# Altium PCB nexnclock_one_in12_6x_rev_2_0.PcbDoc
Units mm, origin at the board's own origin, x right, y up, seen from the top; angles counter-clockwise.
Board outline 147 x 35 mm, 2 copper layers (Top Layer, Bottom Layer), stack 1.571 mm thick; 50 components, 43 nets, 219 pads, 64 vias.
Unrouted connection lines stored in the file: 82.
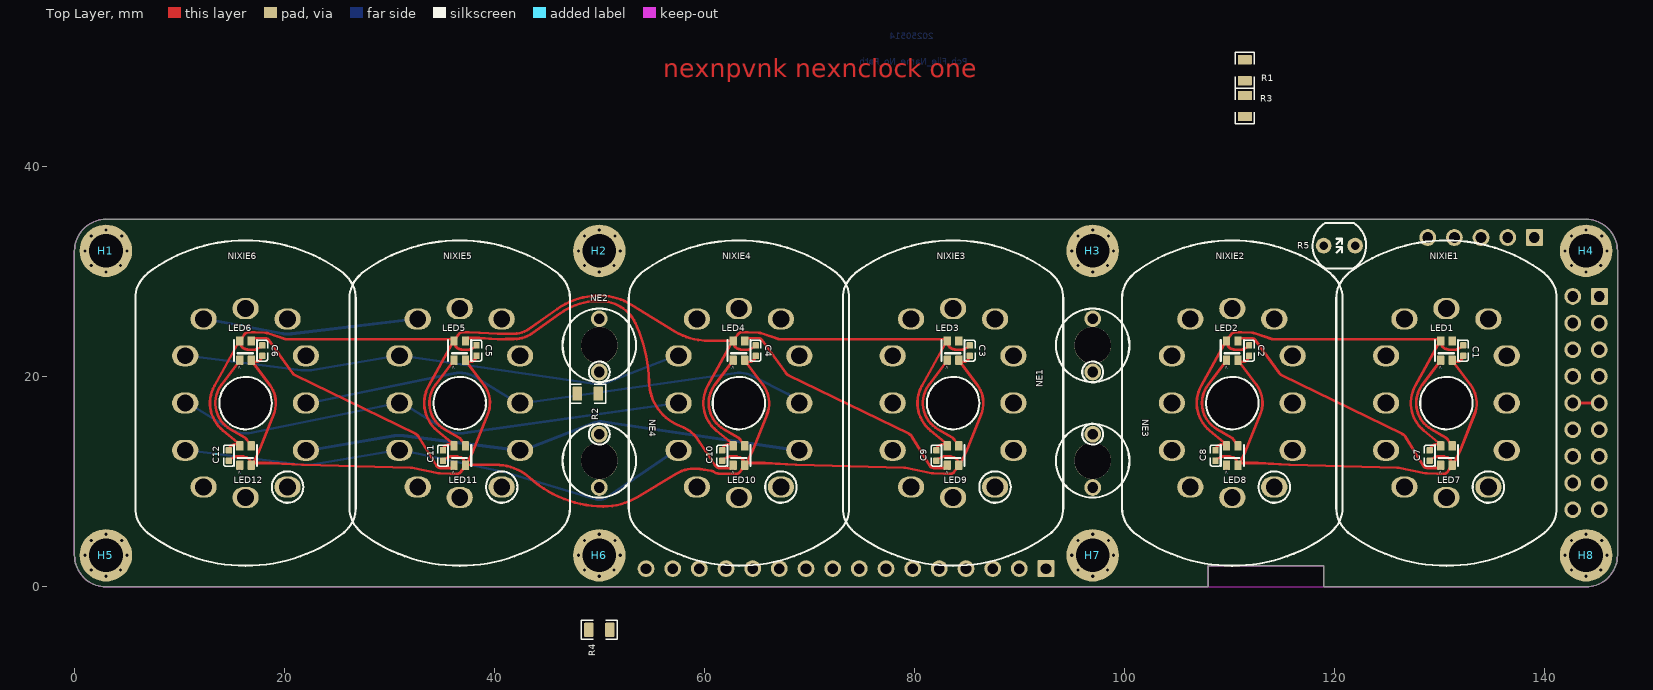
[diagram p0: Top Layer view]
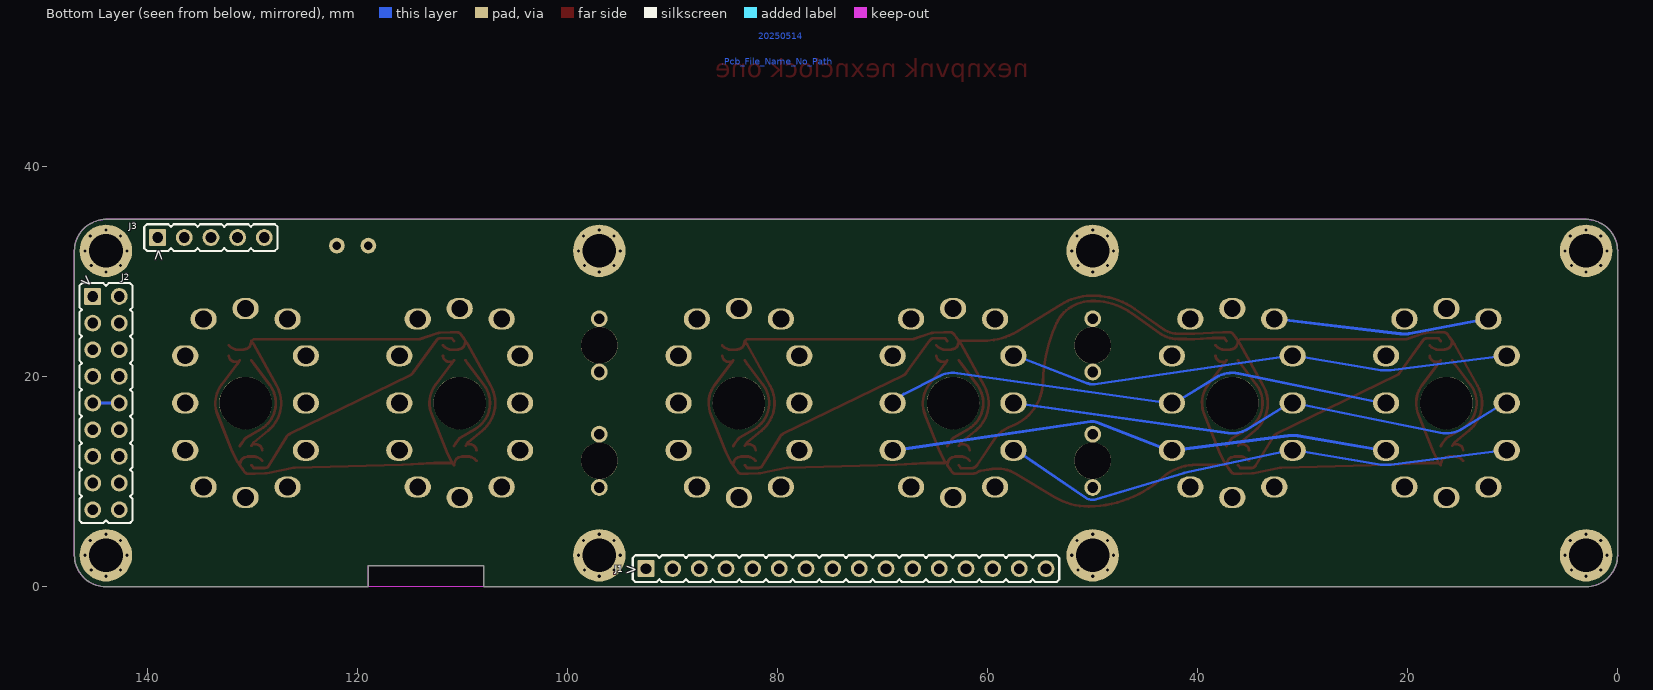
[diagram p1: Bottom Layer view, seen from below]

## Layer stack, top to bottom
Top Solder: solder mask 0.0102, Solder Resist, Dk 3.5
Top Layer: signal copper 0.0356
Dielectric 1: dielectric 1.5, FR-4, Dk 4.8
Bottom Layer: signal copper 0.0356
Bottom Solder: solder mask 0.0102, Solder Resist, Dk 3.5

## Board outline
3,0 cw(c3,3) 0,3 0,32 cw(c3,32) 3,35 144,35 cw(c144,32) 147,32 147,3 cw(c144,3) 144,0 119,0 119,2 108,2 108,0

## Design rules (kind name [scope] priority, off if disabled: settings)
Clearance [All] p1: gap=0.254 ignorepadtopadclearanceinfootprint=TRUE
ComponentClearance ComponentClearance_1 [(Footprint = 'RSH31A')] p1: gap=-5 collisioncheckmode=3 verticalgap=-5 showdistances=FALSE
ComponentClearance [All] p2: gap=0 collisioncheckmode=3 verticalgap=0 showdistances=FALSE
DiffPairsRouting [All] p1: maxlimit=1 minlimit=0.127 mostfreqgap=0.3 toplayer_minwidth=0.127 toplayer_maxwidth=0.381 toplayer_prefwidth=0.3 bottomlayer_minwidth=0.127 bottomlayer_maxwidth=0.381 bottomlayer_prefwidth=0.3 maxuncoupledlength=12.7
Height [All] p1: minheight=0 maxheight=100 prefheight=12.7
HoleSize [All] p1: absolutevalues=TRUE maxlimit=5 minlimit=0.025 maxpercent=80.000 minpercent=20.000
HoleToHoleClearance [All] p1: gap=0.127 allowstackedmicrovias=TRUE
MinimumSolderMaskSliver [All] p1: minsoldermaskwidth=0.05
PolygonConnect PolygonConnect_1 [All] p1: thpad.connectstyle=Relief thpad.reliefconductorwidth=0.254 thpad.reliefentries=4 thpad.polygonreliefangle="90 Angle" thpad.airgapwidth=0.127 smdpad.connectstyle=Relief smdpad.reliefconductorwidth=0.254 smdpad.reliefentries=4 smdpad.polygonreliefangle="90 Angle" smdpad.airgapwidth=0.127 via.connectstyle=Direct via.reliefconductorwidth=0.254 via.reliefentries=4 via.polygonreliefangle="90 Angle" via.airgapwidth=0.254
PolygonConnect PolygonConnect_2 [HasFootprint('R0201')] p2: thpad.connectstyle=Relief thpad.reliefconductorwidth=0.127 thpad.reliefentries=4 thpad.polygonreliefangle="90 Angle" thpad.airgapwidth=0.127 smdpad.connectstyle=Relief smdpad.reliefconductorwidth=0.127 smdpad.reliefentries=4 smdpad.polygonreliefangle="90 Angle" smdpad.airgapwidth=0.127 via.connectstyle=Direct via.reliefconductorwidth=0.254 via.reliefentries=4 via.polygonreliefangle="90 Angle" via.airgapwidth=0.254
RoutingVias [All] p1: holewidth=0.3 width=0.6 viastyle="Through Hole" minholewidth=0.1 minwidth=0.3 maxholewidth=1 maxwidth=1.27
SilkToSilkClearance [All] p1: silktosilkclearance=0
SilkToSolderMaskClearance [IsPad] p1: minsilkscreentomaskgap=0.127 clearancetoexposedcopper=TRUE
SolderMaskExpansion [All] p1: expansion=0.05 istentingtop=FALSE
SupplyNets "Schematic Supply Nets_2" [InNet('HVGND')] p1: voltage=0.000
SupplyNets "Schematic Supply Nets_1" [InNet('VCC_5V0')] p2: voltage=0.000
SupplyNets "Schematic Supply Nets" [InNet('GND')] p3: voltage=0.000
Width [All] p1: maxlimit=6 minlimit=0.2 preferedwidth=0.254
22 further rules are at their usual default settings.

## Components (designator, comment, footprint, x,y, rotation, side; value= is the part's Value field where it differs from the comment)
C1 "CAP" C0402 132.3,22.5 r270 top value=100nF
C2 "CAP" C0402 111.9,22.5 r270 top value=100nF
C3 "CAP" C0402 85.3,22.5 r270 top value=100nF
C4 "CAP" C0402 64.9,22.5 r270 top value=100nF
C5 "CAP" C0402 38.3,22.5 r270 top value=100nF
C6 "CAP" C0402 17.9,22.5 r270 top value=100nF
C7 "CAP" C0402 129.1,12.5 r270 top value=100nF
C8 "CAP" C0402 108.7,12.5 r270 top value=100nF
C9 "CAP" C0402 82.1,12.5 r270 top value=100nF
C10 "CAP" C0402 61.7,12.5 r270 top value=100nF
C11 "CAP" C0402 35.1,12.5 r270 top value=100nF
C12 "CAP" C0402 14.7,12.5 r270 top value=100nF
H1 "MOUNT_HOLE" MOUNT_HOLE_D_3_2_MM 3,32 r0 top locked
H2 "MOUNT_HOLE" MOUNT_HOLE_D_3_2_MM 50,32 r0 top locked
H3 "MOUNT_HOLE" MOUNT_HOLE_D_3_2_MM 97,32 r0 top locked
H4 "MOUNT_HOLE" MOUNT_HOLE_D_3_2_MM 144,32 r0 top locked
H5 "MOUNT_HOLE" MOUNT_HOLE_D_3_2_MM 3,3 r0 top locked
H6 "MOUNT_HOLE" MOUNT_HOLE_D_3_2_MM 50,3 r0 top locked
H7 "MOUNT_HOLE" MOUNT_HOLE_D_3_2_MM 97,3 r0 top locked
H8 "MOUNT_HOLE" MOUNT_HOLE_D_3_2_MM 144,3 r0 top locked
J1 "P_HEADER_1X16" P_HEADER_STRAIGHT_2_54_1X16 73.5,1.73 r180 bottom
J2 "P_HEADER_2X9" P_HEADER_STRAIGHT_2_54_2X9 144,17.5 r270 bottom
J3 "P_HEADER_1X5" P_HEADER_STRAIGHT_2_54_1X5 134,33.27 r180 bottom
LED1 "WS2812B-2020" LED-SMD_4P-L2.0-W2.0-TL_WS2812B-2020 130.7,22.5 r90 top
LED2 "WS2812B-2020" LED-SMD_4P-L2.0-W2.0-TL_WS2812B-2020 110.3,22.5 r90 top
LED3 "WS2812B-2020" LED-SMD_4P-L2.0-W2.0-TL_WS2812B-2020 83.7,22.5 r90 top
LED4 "WS2812B-2020" LED-SMD_4P-L2.0-W2.0-TL_WS2812B-2020 63.3,22.5 r90 top
LED5 "WS2812B-2020" LED-SMD_4P-L2.0-W2.0-TL_WS2812B-2020 36.7,22.5 r90 top
LED6 "WS2812B-2020" LED-SMD_4P-L2.0-W2.0-TL_WS2812B-2020 16.3,22.5 r90 top
LED7 "WS2812B-2020" LED-SMD_4P-L2.0-W2.0-TL_WS2812B-2020 130.7,12.5 r90 top
LED8 "WS2812B-2020" LED-SMD_4P-L2.0-W2.0-TL_WS2812B-2020 110.3,12.5 r90 top
LED9 "WS2812B-2020" LED-SMD_4P-L2.0-W2.0-TL_WS2812B-2020 83.7,12.5 r90 top
LED10 "WS2812B-2020" LED-SMD_4P-L2.0-W2.0-TL_WS2812B-2020 63.3,12.5 r90 top
LED11 "WS2812B-2020" LED-SMD_4P-L2.0-W2.0-TL_WS2812B-2020 36.7,12.5 r90 top
LED12 "WS2812B-2020" LED-SMD_4P-L2.0-W2.0-TL_WS2812B-2020 16.3,12.5 r90 top
NE1 "NEON_LAMP" NEON_LAMP_WITH_HOLE_NEW 97,23 r90 top
NE2 "NEON_LAMP" NEON_LAMP_WITH_HOLE_NEW 50,23 r90 top
NE3 "NEON_LAMP" NEON_LAMP_WITH_HOLE_NEW 97,12 r270 top
NE4 "NEON_LAMP" NEON_LAMP_WITH_HOLE_NEW 50,12 r270 top
NIXIE1 "IN-12" RSH31A 130.7,17.5 r0 top locked
NIXIE2 "IN-12" RSH31A 110.3,17.5 r0 top locked
NIXIE3 "IN-12" RSH31A 83.7,17.5 r0 top locked
NIXIE4 "IN-12" RSH31A 63.3,17.5 r0 top locked
NIXIE5 "IN-12" RSH31A 36.7,17.5 r0 top locked
NIXIE6 "IN-12" RSH31A 16.3,17.5 r0 top locked
R1 "RESISTOR" R0805 111.5,49.2 r90 top value=10k
R2 "RESISTOR" R0805 48.9,18.4 r180 top value=10k
R3 "RESISTOR" R0805 111.5,45.8 r270 top value=10k
R4 "RESISTOR" R0805 50,-4.1 r0 top value=10k
R5 "PHOTORESISTOR" GL55XX_2 120.5,32.5 r180 top value=10k

## Footprints (in the part's own frame and the unit in brackets; to place one, negate y for a bottom-side part, rotate by r counter-clockwise, add the part's x,y. Pads: shape width x height; smd on the part's side, far side on the other; paste and mask are expansions set on the pad)
C0402 [mm]
  rrect20% 0.6x0.6 smd mask+0.05: 1(-0.5,0) 2(0.5,0)
  silkscreen extent -1,-0.5 1,0.5, body extent -0.5,-0.25 0.5,0.25, height 0.52
GL55XX_2 [mm] "Photoresistor 3mm pitch"
  round 1.5 hole 0.8 mask+0.05: 1(-1.5,0) 2(1.5,0)
  silkscreen extent -2.55,-2.15 2.55,2.2
LED-SMD_4P-L2.0-W2.0-TL_WS2812B-2020 [mm]
  rrect20% 0.9x0.7 smd mask+0.05: 1(-0.915,0.55) 2(-0.915,-0.55) 3(0.915,-0.55) 4(0.915,0.55)
  silkscreen extent -1,-1.1 1,1.1, body extent -1.1,-1 1.1,1, height 0.84
MOUNT_HOLE_D_3_2_MM [mm]
  round 5 hole 3.2 mask+0.05: 1(0,0)
NEON_LAMP_WITH_HOLE_NEW [mm] "INS-1, IN-3"
  round 1.6 hole 1.02 unplated mask+0.05: 1(-2.54,0) 2(2.54,0)
  round 3.5 hole 3.5 unplated mask+0.05: HOLE(0,0)
  silkscreen extent -3.54,-3.5 3.5,3.5, body extent -3.5,-3.25 3.5,3.25, height 25
P_HEADER_STRAIGHT_2_54_1X5 [mm]
  rrect10% 1.6x1.6 hole 1.02 paste-2539.97 mask+0.05: 1(-5.08,0)
  round 1.6 hole 1.02 paste-2539.97 mask+0.05: 2(-2.54,0) 3(0,0)
  round 1.6 hole 1.02 mask+0.05: 4(2.54,0) 5(5.08,0)
  silkscreen extent -6.35,-1.27 6.35,1.27, body extent -6.35,-1.25 6.35,1.25, height 8.55
P_HEADER_STRAIGHT_2_54_1X16 [mm]
  rrect10% 1.6x1.6 hole 1.02 paste-2539.97 mask+0.05: 1(-19.05,0)
  round 1.6 hole 1.02 paste-2539.97 mask+0.05: 2(-16.51,0) 3(-13.97,0)
  round 1.6 hole 1.02 mask+0.05: 4(-11.43,0) 5(-8.89,0) 6(-6.35,0) 7(-3.81,0) 8(-1.27,0) 9(1.27,0) 10(3.81,0) 11(6.35,0) 12(8.89,0) 13(11.43,0) 14(13.97,0) 15(16.51,0) 16(19.05,0)
  silkscreen extent -20.32,-1.27 20.32,1.27, body extent -20.32,-1.25 20.32,1.25, height 8.55
P_HEADER_STRAIGHT_2_54_2X9 [mm]
  rrect10% 1.6x1.6 hole 1.02 paste-2539.97 mask+0.05: 1(-10.16,-1.27)
  round 1.6 hole 1.02 paste-2539.97 mask+0.05: 2(-10.16,1.27) 3(-7.62,-1.27)
  round 1.6 hole 1.02 mask+0.05: 4(-7.62,1.27) 5(-5.08,-1.27) 6(-5.08,1.27) 7(-2.54,-1.27) 8(-2.54,1.27) 9(0,-1.27) 10(0,1.27) 11(2.54,-1.27) 12(2.54,1.27) 13(5.08,-1.27) 14(5.08,1.27) 15(7.62,-1.27) 16(7.62,1.27) 17(10.16,-1.27) 18(10.16,1.27)
  silkscreen extent -11.43,-2.54 11.43,2.54, body extent -11.43,-2.52 11.43,2.48, height 8.55
R0805 [mm]
  rrect20% 0.9x1.35 smd mask+0.05: 1(-1,0) 2(1,0)
  silkscreen extent -1.7,-0.9 1.7,0.9, body extent -1,-0.63 1,0.63, height 0.53
RSH31A [mm] "IN-12A, IN-12B, IN-15A, IN-15B"
  oval 2.5x2 hole 1.6 paste-2539.97 mask+0.05: 1(4,-8) 2(5.75,-4.5) 3(5.75,0) 4(5.75,4.5) 5(4,8) 6(0,9) 7(-4,8) 8(-5.75,4.5) 9(-5.75,0) 10(-5.75,-4.5) 11(-4,-8) 12(0,-9)
  silkscreen extent -10.5,-15.5 10.5,15.5, body extent -10.5,-15.48 10.5,15.48, height 29

## Part data
C1 C2 C3 C4 C5 C6 C7 C8 C9 C10 C11 C12: Dielectric=X5R, Manufacturer=_manufacturer, Voltage=10V, Part Reference=_part, PCB Footprint=C0402
H1 H2 H3 H4 H5 H6 H7 H8 J1 J2 J3 LED1 LED2 LED3 LED4 LED5 LED6 LED7 LED8 LED9 LED10 LED11 LED12 R5: Manufacturer=_manufacturer
  H1 H2 H3 H4 H5 H6 H7 H8: PCB Footprint=MOUNT_HOLE_D_3_2_MM, Procurement Type=DNP
  J1: Part Reference=_part, PCB Footprint=P_HEADER_STRAIGHT_2_54_1X16
  J2: Part Reference=_part, PCB Footprint=P_HEADER_STRAIGHT_2_54_2X9
  J3: Part Reference=_part, PCB Footprint=P_HEADER_STRAIGHT_2_54_1X5
  LED1 LED2 LED3 LED4 LED5 LED6 LED7 LED8 LED9 LED10 LED11 LED12: Part Reference=_part, PCB Footprint=LED-SMD_4P-L2.0-W2.0-TL_WS2812B-2020
  R5: Part Reference=_part, PCB Footprint=GL55XX_2
NE1 NE2 NE3 NE4: "INS-1, IN-3", Manufacturer=USSR, Part Reference=_part, PCB Footprint=NEON_LAMP_WITH_HOLE_NEW, Procurement Type=DNP
NIXIE1 NIXIE2 NIXIE3 NIXIE4 NIXIE5 NIXIE6: Manufacturer=USSR, Part Reference=_part, PCB Footprint=RSH31A, Procurement Type=DNP
R1 R2 R3 R4: Manufacturer=_manufacturer, Tolerancy=5%, Part Reference=_part, PCB Footprint=R0805

## Free pads (board coordinates)
  round 5 hole 5 mask+0.05: HOLE(16.3,17.5) HOLE(36.7,17.5) HOLE(63.3,17.5) HOLE(83.7,17.5) HOLE(110.3,17.5) HOLE(130.7,17.5)

## Via types
v1: diameter 0.6, hole 0.3, Top Layer to Bottom Layer, tented bottom, 64 vias

## Nets (pads, with @x,y where several pads share a name; then routed paths per layer and width w, separated by ;. In a path a pad name is that pad's centre, name@x,y a point inside that pad or via, vN(x,y) a via of type N, cw(c..) or ccw(c..) an arc to the next point about the centre after c; other vN are vias at no path point)
A0: J1.2 NIXIE1.1
A1: J1.4 NIXIE2.1
A2: J1.6 R1.1 R2.1 R3.1 R4.1
A3: J1.8 NIXIE3.1
A4: J1.10 NIXIE4.1
A5: J1.12 NIXIE5.1
A6: J1.14 NIXIE6.1
AL_DATA: J3.2 LED1.3
C0: J2.1 NIXIE1.6 NIXIE2.6 NIXIE3.6 NIXIE4.6 NIXIE5.6 NIXIE6.6
C1: J2.2 NIXIE1.7 NIXIE2.7 NIXIE3.7 NIXIE4.7 NIXIE5.7 NIXIE6.7 | length 20.6
  Bottom Layer w0.3: NIXIE6.7 12.55,25.5 19.787,24.121 ccw(c20.05,25.5) 20.05,24.096 20.55,24.096 ccw(c20.55,25.5) 20.716,24.106 32.45,25.5 NIXIE5.7
C2: J2.3 NIXIE1.5 NIXIE2.5 NIXIE3.5 NIXIE4.5 NIXIE5.5 NIXIE6.5
C3: J2.4 NE1.2
C4: J2.5 NIXIE1.4 NIXIE2.4 NIXIE3.4 NIXIE4.4 NIXIE5.4 NIXIE6.4
C5: J2.6 NIXIE1.8 NIXIE2.8 NIXIE3.8 NIXIE4.8 NIXIE5.8 NIXIE6.8 | length 47.9
  Bottom Layer w0.254: NIXIE6.8 10.8,22 21.627,20.63 ccw(c21.8,22) 21.8,20.619 22.3,20.619 ccw(c22.3,22) 22.527,20.638 30.7,22 NIXIE5.8 31.2,22 49.83,19.291 ccw(c50,20.46) 50.424,19.358 57.3,22 NIXIE4.8
C6: J2.7 NIXIE1.9 NIXIE2.9 NIXIE3.9 NIXIE4.9 NIXIE5.9 NIXIE6.9 | length 49
  Bottom Layer w0.254: NIXIE6.9 10.8,17.5 14.791,15.046 ccw(c16.3,17.5) 16.876,14.677 30.7,17.5 NIXIE5.9 31.2,17.5 35.191,15.046 ccw(c36.7,17.5) 37.103,14.647 57.3,17.5 NIXIE4.9
C7: J2.8 NE2.2
C8: J2.11
C9: J2.12 NIXIE1.3 NIXIE2.3 NIXIE3.3 NIXIE4.3 NIXIE5.3 NIXIE6.3 | length 49.1
  Bottom Layer w0.254: NIXIE6.3 22.3,17.5 36.124,20.323 cw(c36.7,17.5) 38.209,19.954 42.2,17.5 NIXIE5.3 42.7,17.5 62.891,20.352 62.899,20.353 cw(c63.3,17.5) 64.6,20.071 ; 64.601,20.071 64.607,20.068 67.987,18.357 67.989,18.356 cw(c67.7,17.79) 68.178,18.209 68.8,17.5 NIXIE4.3
C10: J2.13 NE4.2
C11: J2.14 NIXIE1.10 NIXIE2.10 NIXIE3.10 NIXIE4.10 NIXIE5.10 NIXIE6.10 | length 49.2
  Bottom Layer w0.254: NIXIE6.10 10.8,13 21.627,11.63 ccw(c21.8,13) 21.8,11.619 22.3,11.619 ccw(c22.3,13) 22.527,11.638 30.7,13 NIXIE5.10 31.2,13 41.232,10.852 41.24,10.85 cw(c40.95,9.5) 41.345,10.823 41.353,10.821 49.657,8.33 49.661,8.329 ccw(c50,9.46) 50.664,8.484 50.668,8.486 57.3,13 NIXIE4.10
C12: J2.15 NIXIE1.2 NIXIE2.2 NIXIE3.2 NIXIE4.2 NIXIE5.2 NIXIE6.2 | length 47.9
  Bottom Layer w0.3: NIXIE6.2 22.3,13 30.465,14.384 cw(c30.7,13) 30.697,14.404 31.2,14.404 cw(c31.2,13) 31.379,14.393 42.2,13 NIXIE5.2 42.7,13 49.559,15.66 49.567,15.663 cw(c50,14.54) 50.173,15.732 50.18,15.73 68.8,13 NIXIE4.2
C13: J2.16 NE3.2
C14: J2.17 NIXIE1.11 NIXIE2.11 NIXIE3.11 NIXIE4.11 NIXIE5.11 NIXIE6.11
C15: J2.18 NIXIE1.12 NIXIE2.12 NIXIE3.12 NIXIE4.12 NIXIE5.12 NIXIE6.12
GND: C1.2 C2.2 C3.2 C4.2 C5.2 C6.2 C7.2 C8.2 C9.2 C10.2 C11.2 C12.2 J3.1 J3.4 LED1.2 LED2.2 LED3.2 LED4.2 LED5.2 LED6.2 LED7.2 LED8.2 LED9.2 LED10.2 LED11.2 LED12.2 R5.2 | length 180.7
  Top Layer w0.254: C12.2 14.873,12.173 15.27,12.369 cw(c15.47,11.965) 15.468,12.416 16.03,12.416 cw(c16.03,11.965) 16.148,12.4 16.331,12.35 16.333,12.35 cw(c16.165,11.738) 16.776,11.908 LED12.2 17.073,11.798 18.719,11.798 cw(c18.718,11.163) 18.754,11.797 ; LED6.2 16.995,21.375 17.073,21.262 18.601,19.233 cw(c16.3,17.5) 18.975,16.429 17.549,12.867 cw(c17.13,13.035) 17.534,12.834 LED12.2@17.073,11.908 ; LED6.2@17.073,21.428 17.268,21.428 ccw(c17.268,22.063) 17.857,21.827 C6.2 ; 18.756,11.797 21.718,11.621 ccw(c21.8,13) 21.764,11.619 32.042,11.352 cw(c32.026,10.717) 32.151,11.34 34.672,10.83 ccw(c34.86,11.76) 34.807,10.812 35.845,10.755 ccw(c35.87,11.205) 35.87,10.754 36.43,10.754 ccw(c36.43,11.205) 36.796,10.941 37.027,11.262 LED11.2 ; C11.2 35.273,12.173 35.67,12.369 cw(c35.87,11.965) 35.868,12.416 36.43,12.416 cw(c36.43,11.965) 36.548,12.4 36.731,12.35 36.733,12.35 cw(c36.565,11.738) 37.176,11.908 LED11.2 ; LED5.2 37.395,21.375 37.473,21.262 39.001,19.233 cw(c36.7,17.5) 39.375,16.429 37.949,12.867 cw(c37.53,13.035) 37.934,12.834 37.473,11.908 LED11.2 ; LED5.2@37.473,21.428 37.668,21.428 ccw(c37.668,22.063) 38.257,21.827 C5.2 ; C10.2 61.873,12.173 62.27,12.369 cw(c62.47,11.965) 62.468,12.416 63.03,12.416 cw(c63.03,11.965) 63.148,12.4 63.331,12.35 63.333,12.35 cw(c63.165,11.738) 63.776,11.908 LED10.2 63.627,11.262 63.396,10.941 cw(c63.03,11.205) 63.03,10.754 62.47,10.754 cw(c62.47,11.205) 62.46,10.754 61.441,10.775 cw(c61.46,11.76) 60.907,10.945 ccw(c60.552,10.418) 60.652,11.045 59.597,11.215 ccw(c59.065,7.911) 57.341,10.78 53.598,8.534 cw(c50.404,13.854) 50.376,7.649 cw(c50.451,18.173) 50.374,7.649 cw(c50.451,18.173) 43.393,10.366 cw(c50.451,18.173) 43.391,10.368 ccw(c40.152,6.801) 40.131,11.619 cw(c40.13,12.254) 40.13,11.619 37.473,11.619 LED11.2 ; LED4.2 63.995,21.375 64.073,21.262 65.601,19.233 cw(c63.3,17.5) 65.975,16.429 64.549,12.867 cw(c64.13,13.035) 64.534,12.834 LED10.2@64.073,11.908 ; LED10.2@64.073,11.798 65.719,11.798 cw(c65.718,11.163) 65.754,11.797 ; LED4.2@64.073,21.428 64.268,21.428 ccw(c64.268,22.063) 64.857,21.827 C4.2 ; 65.756,11.797 68.718,11.621 ccw(c68.8,13) 68.764,11.619 79.042,11.352 cw(c79.026,10.717) 79.151,11.34 81.672,10.83 ccw(c81.86,11.76) 81.807,10.812 82.845,10.755 ccw(c82.87,11.205) 82.87,10.754 83.43,10.754 ccw(c83.43,11.205) 83.796,10.941 84.027,11.262 LED9.2 ; C9.2 82.273,12.173 82.67,12.369 cw(c82.87,11.965) 82.868,12.416 83.43,12.416 cw(c83.43,11.965) 83.548,12.4 83.731,12.35 83.733,12.35 cw(c83.565,11.738) 84.176,11.908 LED9.2 ; LED3.2 84.395,21.375 84.473,21.262 86.001,19.233 cw(c83.7,17.5) 86.375,16.429 84.949,12.867 cw(c84.53,13.035) 84.934,12.834 84.473,11.908 LED9.2 ; LED3.2@84.473,21.428 84.668,21.428 ccw(c84.668,22.063) 85.257,21.827 C3.2 ; C8.2 108.873,12.173 109.27,12.369 cw(c109.47,11.965) 109.468,12.416 110.03,12.416 cw(c110.03,11.965) 110.148,12.4 110.331,12.35 110.333,12.35 cw(c110.165,11.738) 110.776,11.908 LED8.2 111.073,11.798 112.719,11.798 cw(c112.718,11.163) 112.754,11.797 ; LED2.2 110.995,21.375 111.073,21.262 112.601,19.233 cw(c110.3,17.5) 112.975,16.429 111.549,12.867 cw(c111.13,13.035) 111.534,12.834 LED8.2@111.073,11.908 ; LED2.2@111.073,21.428 111.268,21.428 ccw(c111.268,22.063) 111.857,21.827 C2.2 ; 112.756,11.797 115.718,11.621 ccw(c115.8,13) 115.764,11.619 126.042,11.352 cw(c126.026,10.717) 126.151,11.34 ; 126.152,11.34 128.672,10.83 ccw(c128.86,11.76) 128.807,10.812 129.845,10.755 ccw(c129.87,11.205) 129.87,10.754 130.43,10.754 ccw(c130.43,11.205) 130.796,10.941 131.027,11.262 LED7.2 ; C7.2 129.273,12.173 129.67,12.369 cw(c129.87,11.965) 129.868,12.416 130.43,12.416 cw(c130.43,11.965) 130.548,12.4 130.731,12.35 130.733,12.35 cw(c130.565,11.738) 131.176,11.908 LED7.2 ; LED1.2 131.395,21.375 131.473,21.262 133.001,19.233 cw(c130.7,17.5) 133.375,16.429 ; LED1.2@131.473,21.428 131.668,21.428 ccw(c131.668,22.063) 132.257,21.827 C1.2 ; 133.375,16.429 131.949,12.867 cw(c131.53,13.035) 131.934,12.834 131.473,11.908 LED7.2
HVGND: J2.9 J2.10 | length 5.1
  Top Layer w0.254: J2.10 J2.9
  Bottom Layer w0.254: J2.10 J2.9
NetJ3_5: J3.5 R5.1
NetLED1_1: LED1.1 LED7.3 | length 10.4
  Top Layer w0.254: LED1.1 129.927,21.262 128.399,19.233 ccw(c130.7,17.5) 129.242,15.015 130.658,14.184 cw(c130.43,13.795) 130.796,14.059 131.027,13.738 LED7.3
NetLED2_1: LED2.1 LED8.3 | length 10.4
  Top Layer w0.254: LED2.1 109.527,21.262 107.999,19.233 ccw(c110.3,17.5) 108.842,15.015 110.258,14.184 cw(c110.03,13.795) 110.396,14.059 110.627,13.738 LED8.3
NetLED2_3: LED2.3 LED7.1 | length 24.3
  Top Layer w0.254: LED2.3 111.073,23.681 111.66,23.681 112.14,23.681 cw(c112.14,23.24) 112.497,23.499 114.782,20.353 ccw(c115.296,20.726) 115.017,20.156 126.508,14.558 126.509,14.557 cw(c126.23,13.987) 126.771,14.319 128.484,11.529 ccw(c128.86,11.76) 128.86,11.319 129.34,11.319 129.927,11.319 LED7.1
NetLED3_1: LED3.1 LED9.3 | length 10.4
  Top Layer w0.254: LED3.1 82.927,21.262 81.399,19.233 ccw(c83.7,17.5) 82.242,15.015 83.658,14.184 cw(c83.43,13.795) 83.796,14.059 84.027,13.738 LED9.3
NetLED3_3: LED3.3 LED8.1
NetLED4_1: LED4.1 LED10.3 | length 10.4
  Top Layer w0.254: LED4.1 62.527,21.262 60.999,19.233 ccw(c63.3,17.5) 61.842,15.015 63.258,14.184 cw(c63.03,13.795) 63.396,14.059 63.627,13.738 LED10.3
NetLED4_3: LED4.3 LED9.1 | length 24.3
  Top Layer w0.254: LED4.3 64.073,23.681 64.66,23.681 65.14,23.681 cw(c65.14,23.24) 65.497,23.499 67.782,20.353 ccw(c68.296,20.726) 68.017,20.156 79.508,14.558 79.509,14.557 cw(c79.23,13.987) 79.771,14.319 81.484,11.529 ccw(c81.86,11.76) 81.86,11.319 82.34,11.319 82.927,11.319 LED9.1
NetLED5_1: LED5.1 LED11.3 | length 10.4
  Top Layer w0.254: LED5.1 35.927,21.262 34.399,19.233 ccw(c36.7,17.5) 35.242,15.015 36.658,14.184 cw(c36.43,13.795) 36.796,14.059 37.027,13.738 LED11.3
NetLED5_3: LED5.3 LED10.1 | length 36.4
  Top Layer w0.254: LED5.3 37.455,23.699 38.059,23.699 ; 38.06,23.699 38.54,23.699 cw(c38.54,23.24) 38.569,23.698 40.34,23.596 ccw(c40.371,24.121) 40.344,23.596 ccw(c40.45,25.5) 40.45,23.593 40.95,23.593 ccw(c40.95,25.5) 41.062,23.596 41.08,23.597 cw(c41.123,22.874) 41.119,23.599 41.121,23.599 41.401,23.599 41.865,23.599 ; 41.865,23.599 ccw(c41.865,24.107) 41.868,23.599 ccw(c41.858,26.644) 43.62,24.162 46.283,26.05 cw(c49.977,20.84) 50.158,27.225 50.163,27.225 cw(c50.059,23.424) 52.048,26.665 ; 52.049,26.664 52.054,26.661 52.238,26.548 cw(c51.906,26.007) 52.277,26.522 ; 52.278,26.521 cw(c50.107,23.527) 53.563,24.845 53.563,24.843 ccw(c54.156,25.071) 53.572,24.822 cw(c40.492,19.191) 54.728,19.55 ccw(c59.4,19.663) 54.728,19.549 ccw(c59.4,19.663) 57.537,15.377 58.074,15.144 cw(c56.904,12.455) 59.205,14.273 cw(c58.706,13.88) 59.232,14.236 61.028,11.58 ccw(c61.554,11.936) 61.134,11.459 61.169,11.429 ccw(c61.46,11.76) 61.348,11.333 61.393,11.322 ccw(c61.554,11.936) 61.553,11.301 62.527,11.301 62.545,11.301 LED10.1
NetLED6_1: LED6.1 LED12.3 | length 10.4
  Top Layer w0.254: LED6.1 15.527,21.262 13.999,19.233 ccw(c16.3,17.5) 14.842,15.015 16.258,14.184 cw(c16.03,13.795) 16.396,14.059 16.627,13.738 LED12.3
NetLED6_3: LED6.3 LED11.1 | length 24.3
  Top Layer w0.254: LED6.3 17.073,23.681 17.66,23.681 18.14,23.681 cw(c18.14,23.24) 18.497,23.499 20.782,20.353 ccw(c21.296,20.726) 21.017,20.156 32.508,14.558 32.509,14.557 cw(c32.23,13.987) 32.771,14.319 34.484,11.529 ccw(c34.86,11.76) 34.86,11.319 35.34,11.319 35.927,11.319 LED11.1
NetNE1_1: NE1.1 R1.2
NetNE2_1: NE2.1 R2.2
NetNE3_1: NE3.1 R3.2
NetNE4_1: NE4.1 R4.2
VCC_5V0: C1.1 C2.1 C3.1 C4.1 C5.1 C6.1 C7.1 C8.1 C9.1 C10.1 C11.1 C12.1 J3.3 LED1.4 LED2.4 LED3.4 LED4.4 LED5.4 LED6.4 LED7.4 LED8.4 LED9.4 LED10.4 LED11.4 LED12.4 | length 185.8
  Top Layer w0.254: C12.1 14.743,13.173 cw(c15.332,12.937) 15.332,13.572 LED12.4@15.527,13.572 ; LED12.4@15.737,13.425 15.604,13.624 15.527,13.738 14.136,14.892 cw(c16.3,17.5) 13.337,19.144 15.527,23.092 LED6.4 ; C6.1 17.727,22.827 17.33,22.631 cw(c17.13,23.035) 17.132,22.584 16.57,22.584 cw(c16.57,23.035) 16.452,22.6 16.269,22.65 16.267,22.65 cw(c16.435,23.262) 15.824,23.092 LED6.4 ; C11.1 35.143,13.173 cw(c35.732,12.937) 35.732,13.572 LED11.4@35.927,13.572 ; LED11.4@36.137,13.425 36.004,13.624 35.927,13.738 34.536,14.892 cw(c36.7,17.5) 33.737,19.144 35.927,23.092 LED5.4 ; C5.1 38.127,22.827 37.73,22.631 cw(c37.53,23.035) 37.532,22.584 36.97,22.584 cw(c36.97,23.035) 36.852,22.6 36.669,22.65 36.667,22.65 cw(c36.835,23.262) 36.224,23.092 LED5.4 ; 45.989,26.465 43.325,24.575 cw(c41.858,26.644) 41.865,24.107 41.863,24.107 41.121,24.107 ccw(c41.121,23.599) 41.119,24.107 41.117,24.107 40.344,24.106 cw(c40.345,24.741) 40.309,24.107 38.598,24.205 ccw(c38.54,23.24) 38.575,24.206 37.55,24.246 cw(c37.574,24.88) 37.547,24.246 ccw(c37.53,23.795) 37.53,24.246 36.97,24.246 ccw(c36.97,23.795) 36.604,24.059 36.373,23.738 LED5.4 ; 45.989,26.465 cw(c49.977,20.84) 50.173,27.733 cw(c50.02,21.937) 53.054,26.877 57.247,24.302 ccw(c60.222,29.139) 59.424,23.516 60.035,23.431 ccw(c60.122,24.06) 60.122,23.425 62.527,23.425 LED4.4 ; C10.1 61.743,13.173 cw(c62.332,12.937) 62.332,13.572 LED10.4@62.527,13.572 ; LED10.4@62.737,13.425 62.604,13.624 62.527,13.738 61.136,14.892 cw(c63.3,17.5) 60.337,19.144 62.527,23.092 LED4.4 ; C4.1 64.727,22.827 64.33,22.631 cw(c64.13,23.035) 64.132,22.584 63.57,22.584 cw(c63.57,23.035) 63.452,22.6 63.269,22.65 63.267,22.65 cw(c63.435,23.262) 62.824,23.092 LED4.4 ; C9.1 82.143,13.173 cw(c82.732,12.937) 82.732,13.572 LED9.4@82.927,13.572 ; LED9.4@83.137,13.425 83.004,13.624 82.927,13.738 81.536,14.892 cw(c83.7,17.5) 80.737,19.144 82.927,23.092 LED3.4 ; C3.1 85.127,22.827 84.73,22.631 cw(c84.53,23.035) 84.532,22.584 83.97,22.584 cw(c83.97,23.035) 83.852,22.6 83.669,22.65 83.667,22.65 cw(c83.835,23.262) 83.224,23.092 LED3.4 ; C8.1 108.743,13.173 cw(c109.332,12.937) 109.332,13.572 LED8.4@109.527,13.572 ; LED8.4@109.737,13.425 109.604,13.624 109.527,13.738 108.136,14.892 cw(c110.3,17.5) 107.337,19.144 109.527,23.092 LED2.4 ; C2.1 111.727,22.827 111.33,22.631 cw(c111.13,23.035) 111.132,22.584 110.57,22.584 cw(c110.57,23.035) 110.452,22.6 110.269,22.65 110.267,22.65 cw(c110.435,23.262) 109.824,23.092 LED2.4 ; C7.1 129.143,13.173 cw(c129.732,12.937) 129.732,13.572 LED7.4@129.927,13.572 ; LED7.4@130.137,13.425 130.004,13.624 129.927,13.738 128.536,14.892 cw(c130.7,17.5) 127.737,19.144 129.927,23.092 LED1.4 ; C1.1 132.127,22.827 131.73,22.631 cw(c131.53,23.035) 131.532,22.584 130.97,22.584 cw(c130.97,23.035) 130.852,22.6 130.669,22.65 130.667,22.65 cw(c130.835,23.262) 130.224,23.092 LED1.4 ; LED6.4 15.973,23.738 16.204,24.059 cw(c16.57,23.795) 16.569,24.246 17.13,24.246 cw(c17.13,23.795) 17.155,24.245 18.193,24.188 cw(c18.14,23.24) 18.438,24.141 18.441,24.14 20.056,23.606 20.058,23.605 ccw(c20.255,24.209) 20.255,23.574 35.927,23.574 LED5.4 ; LED4.4 62.973,23.738 63.204,24.059 cw(c63.57,23.795) 63.569,24.246 64.13,24.246 cw(c64.13,23.795) 64.155,24.245 65.193,24.188 cw(c65.14,23.24) 65.438,24.141 65.441,24.14 67.056,23.606 67.058,23.605 ccw(c67.255,24.209) 67.255,23.574 82.927,23.574 LED3.4 ; LED2.4 109.973,23.738 110.204,24.059 cw(c110.57,23.795) 110.569,24.246 111.13,24.246 cw(c111.13,23.795) 111.155,24.245 112.193,24.188 cw(c112.14,23.24) 112.438,24.141 112.441,24.14 114.056,23.606 114.058,23.605 ccw(c114.255,24.209) 114.255,23.574 129.927,23.574 LED1.4
pads on no net: H1.1 H2.1 H3.1 H4.1 H5.1 H6.1 H7.1 H8.1 J1.1 J1.3 J1.5 J1.7 J1.9 J1.11 J1.13 J1.15 J1.16 LED12.1 NE1.HOLE NE2.HOLE NE3.HOLE NE4.HOLE
copper on no net:
  other v1: 3,1 50,1 97,1 144,1 1.6,1.6 4.4,1.6 48.6,1.6 51.4,1.6 95.6,1.6 98.4,1.6 142.6,1.6 145.4,1.6 1,3 5,3 48,3 52,3 95,3 99,3 142,3 146,3 1.6,4.4 4.5,4.4 48.6,4.4 51.5,4.4 95.6,4.4 98.5,4.4 142.6,4.4 145.5,4.4 3,5 50,5 97,5 144,5 3,30 50,30 97,30 144,30 1.6,30.6 4.4,30.6 48.6,30.6 51.4,30.6 95.6,30.6 98.4,30.6 142.6,30.6 145.4,30.6 1,32 5,32 48,32 52,32 95,32 99,32 142,32 146,32 1.6,33.4 4.5,33.4 48.6,33.4 51.5,33.4 95.6,33.4 98.5,33.4 142.6,33.4 145.5,33.4 3,34 50,34 97,34 144,34

## Keep-outs
Keep-Out Layer:
  lines w0.05: 108,0 119,0 ; 108,0 108,2 119,2 119,0 ; 108,0 3,0 cw(c3,3) 0,3 0,32 cw(c3,32) 3,35 144,35 cw(c144,32) 147,32 147,3 cw(c144,3) 144,0 119,0

## Other copper
Top Layer:
  text "nexnpvnk nexnclock one" at 56.107,47.977 h3
Bottom Layer:
  text "20250514" at 81.873,52.183 h0.64
  text ".Pcb_File_Name_No_Path" at 85.373,49.736 h0.64

## Silkscreen, mask and mechanical layers (free items; w line width, h text height)
Top Solder:
  text "nexnpvnk nexnclock one" at 56.107,47.977 h3

## Text inside footprints (layer, text, board x,y; h text height)
J1: Bottom Overlay ">" at 94.55,1.2 h1
J2: Bottom Overlay ">" at 146.53,29.223 h1 r45
J3: Bottom Overlay ">" at 138.54,31.02 h1 r270
LED1: Top Overlay ">" at 130.25,20.725 h0.3 r90
LED2: Top Overlay ">" at 109.85,20.725 h0.3 r90
LED3: Top Overlay ">" at 83.25,20.725 h0.3 r90
LED4: Top Overlay ">" at 62.85,20.725 h0.3 r90
LED5: Top Overlay ">" at 36.25,20.725 h0.3 r90
LED6: Top Overlay ">" at 15.85,20.725 h0.3 r90
LED7: Top Overlay ">" at 130.25,10.725 h0.3 r90
LED8: Top Overlay ">" at 109.85,10.725 h0.3 r90
LED9: Top Overlay ">" at 83.25,10.725 h0.3 r90
LED10: Top Overlay ">" at 62.85,10.725 h0.3 r90
LED11: Top Overlay ">" at 36.25,10.725 h0.3 r90
LED12: Top Overlay ">" at 15.85,10.725 h0.3 r90